# Altium PCB Piezo_Regulator_Head.PcbDoc (part 3 of 4)
Units mil, origin at the board's own origin, x right, y up, seen from the top; angles counter-clockwise.
Board outline 2047.24 x 1850.39 mil, 6 copper layers (Top Layer, GROUND, SIGNAL1, SIGNAL2, POWER, Bottom Layer), stack 60.866 mil thick; 136 components, 91 nets, 517 pads, 213 vias.
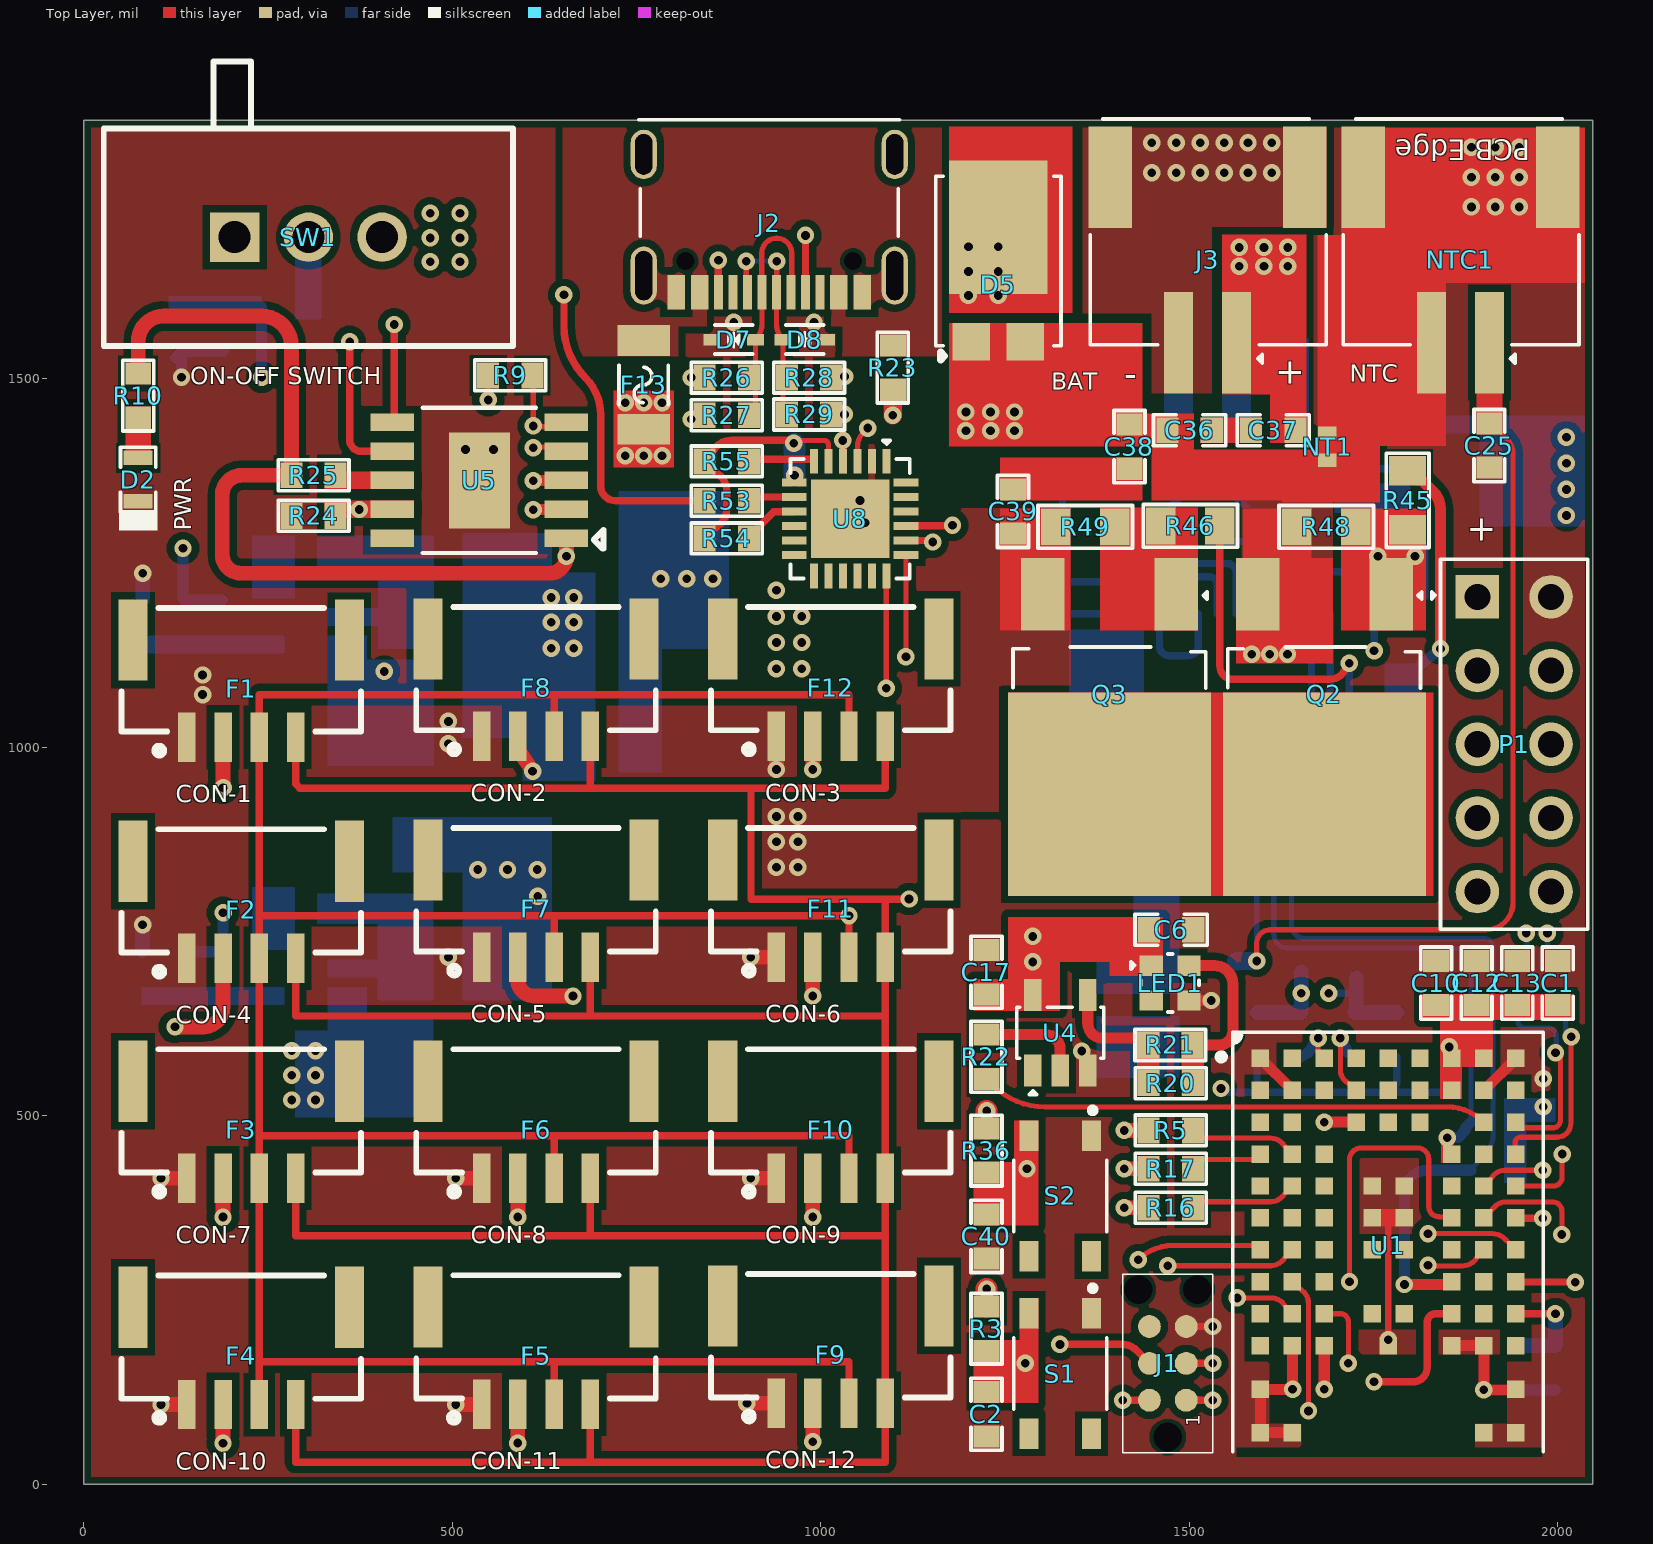
[diagram p0: Top Layer view]

## Part data (continued)
S1 S2: "SWITCH TACTILE SPST-NO 0.05A 16V", Case/Package=SMD/SMT, Color=Clear, Contact Current Rating=50mA, Contact Resistance=500mΩ, Insulation Resistance=100MΩ, Manufacturer=ALPS, Max Operating Temperature=85°C, Max Voltage Rating (DC)=16V, Min Operating Temperature=-30°C, Operating Force=1.57N, Supplier Part Number=4809-SKRPABE010CT-ND, Actuator Length=711.2µm, ComponentLink1Description=https://datasheet.octopart.com:443/SKRPABE010-ALPS-datasheet-182234810.pdf?src-supplier=IHS, ComponentLink1URL=https://datasheet.octopart.com:443/SKRPABE010-ALPS-datasheet-182234810.pdf?src-supplier=IHS, ComponentLink2Description=https://datasheet.octopart.com:443/SKRPABE010-ALPS-datasheet-182235266.pdf?src-supplier=IHS, ComponentLink2URL=https://datasheet.octopart.com:443/SKRPABE010-ALPS-datasheet-182235266.pdf?src-supplier=IHS, ComponentLink3Description=https://datasheet.octopart.com:443/SKRPABE010-ALPS-datasheet-41327040.pdf?src-supplier=Master+Electronics, ComponentLink3URL=https://datasheet.octopart.com:443/SKRPABE010-ALPS-datasheet-41327040.pdf?src-supplier=Master+Electronics, ComponentLink4Description=https://datasheet.octopart.com:443/SKRPABE010-ALPS-datasheet-138899521.pdf?src-supplier=TME, ComponentLink4URL=https://datasheet.octopart.com:443/SKRPABE010-ALPS-datasheet-138899521.pdf?src-supplier=TME, ComponentLink5Description=https://datasheet.octopart.com:443/SKRPABE010-ALPS-datasheet-37145204.pdf?src-supplier=Electro+Sonic, ComponentLink5URL=https://datasheet.octopart.com:443/SKRPABE010-ALPS-datasheet-37145204.pdf?src-supplier=Electro+Sonic, Contact Plating=Silver, Current Rating=50mA, Depth=4.6mm, Electrical Life=100kcycles, Height=1.8034mm, Item Type="Tactile Switches", Lead Free="Lead Free", Length=4.191mm, Life (Cycles)=100kcycles, Lifecycle Status=Production, Manufacturer Part Number=SKRPABE010, Max Current Rating=50mA, Mounting Technology="Surface Mount", Number of Positions=1, Orientation=Straight, Pricing="1=0.21, 10=0.179, 25=0.1684, 100=0.1511, 250=0.14016, 500=0.13228, 1000=0.12484 (USD)", Radiation Hardening=No, RoHS=Compliant, Stock=35807, Supplier=DigiKey, Termination=J-Bend, Throw Configuration=SPST, Voltage Rating (DC)=16V
SW1: "SWITCH SLIDE SPDT 4A 125V", Contact Current Rating=2A, Contact Resistance=10mΩ, Contact Voltage Rating (AC)=250V, Current Rating=1A, Dielectric Material=Thermoplastic, Insulation Resistance=1GΩ, Manufacturer=APEM, Max Operating Temperature=85°C, Max Voltage Rating (DC)=30V, Min Operating Temperature=-40°C, Voltage Rating (AC)=125V, Actuator Length=2.3mm, Actuator Material="Glass, Glass fibre, Nylon, Polyamide", ComponentLink1Description=https://datasheet.octopart.com:443/25336NA-APEM-datasheet-13521368.pdf?src-supplier=IHS, ComponentLink1URL=https://datasheet.octopart.com:443/25336NA-APEM-datasheet-13521368.pdf?src-supplier=IHS, ComponentLink2Description=https://datasheet.octopart.com:443/25336NA-APEM-datasheet-41567066.pdf?src-supplier=Master+Electronics, ComponentLink2URL=https://datasheet.octopart.com:443/25336NA-APEM-datasheet-41567066.pdf?src-supplier=Master+Electronics, ComponentLink3Description=https://datasheet.octopart.com:443/25336NA-APEM-datasheet-178036094.pdf?src-supplier=TME, ComponentLink3URL=https://datasheet.octopart.com:443/25336NA-APEM-datasheet-178036094.pdf?src-supplier=TME, ComponentLink4Description=https://datasheet.octopart.com:443/25336NA-APEM-datasheet-10337772.pdf?src-supplier=Newark, ComponentLink4URL=https://datasheet.octopart.com:443/25336NA-APEM-datasheet-10337772.pdf?src-supplier=Newark, ComponentLink5Description=https://datasheet.octopart.com:443/25336NA-APEM-datasheet-23707371.pdf?src-supplier=Electro+Sonic, ComponentLink5URL=https://datasheet.octopart.com:443/25336NA-APEM-datasheet-23707371.pdf?src-supplier=Electro+Sonic, ComponentLink6Description=https://datasheet.octopart.com:443/25336NA-APEM-datasheet-165057810.pdf?src-supplier=Burklin+Elektronik, ComponentLink6URL=https://datasheet.octopart.com:443/25336NA-APEM-datasheet-165057810.pdf?src-supplier=Burklin+Elektronik, ComponentLink7Description=https://datasheet.octopart.com:443/25336NA-APEM-datasheet-491718.pdf?src-supplier=Factory+Futures, ComponentLink7URL=https://datasheet.octopart.com:443/25336NA-APEM-datasheet-491718.pdf?src-supplier=Factory+Futures, Contact Material=Silver, Contact Plating=Silver, Depth=9.8mm, Electrical Life=10kcycles, Height=8.1mm, Item Type="Slide Switches", Length=14.1mm, Life (Cycles)=10kcycles, Lifecycle Status=Production, Manufacturer Part Number=25336NA, Max Current Rating=1A, Max Voltage Rating (AC)=250V, Mechanical Life=20kcycles, Mounting Technology="Through Hole", Number of Positions=2, Orientation="Right Angle", Packaging=Bulk, Pricing="1=2.2457 (USD)", REACH SVHC=Yes, RoHS=Compliant, Sealable="EPOXY TERMINAL SEALED", Stock=4, Supplier="Arrow Electronics", Supplier Part Number=25336NA, Switch Function=On-On, Switch Travel=4mm, Terminal Material=Silver, Termination="PC Pin", Throw Configuration=SPDT, Voltage Rating (DC)=30V, Width=14mm
TVS1: "TVS DIODE 24VWM 44VC SOT233", Breakdown Voltage=29.1V, Case/Package=SOT-23, Clamping Voltage=44V, LCSC Part Number=C14486, Leakage Current=100nA, Manufacturer=onsemi, Manufacturer Lifecycle Status=ACTIVE, Max Breakdown Voltage=32V, Max Operating Temperature=150°C, Max Power Dissipation=350W, Max Surge Current=8A, Min Breakdown Voltage=26.2V, Min Operating Temperature=-55°C, Operating Supply Voltage=24V, Power Line Protection=No, Test Current=1mA, China RoHS=Compliant, ComponentLink1Description=https://datasheet.octopart.com:443/NUP2105LT1G-onsemi-datasheet-180968600.pdf?src-supplier=IHS, ComponentLink1URL=https://datasheet.octopart.com:443/NUP2105LT1G-onsemi-datasheet-180968600.pdf?src-supplier=IHS, ComponentLink2Description=https://datasheet.octopart.com:443/NUP2105LT1G-ON-Semiconductor-datasheet-141916699.pdf?src-supplier=Upverter, ComponentLink2URL=https://datasheet.octopart.com:443/NUP2105LT1G-ON-Semiconductor-datasheet-141916699.pdf?src-supplier=Upverter, ComponentLink3Description=https://datasheet.octopart.com:443/NUP2105LT1G-ON-Semiconductor-datasheet-138898254.pdf?src-supplier=onsemi, ComponentLink3URL=https://datasheet.octopart.com:443/NUP2105LT1G-ON-Semiconductor-datasheet-138898254.pdf?src-supplier=onsemi, ComponentLink4Description=https://datasheet.octopart.com:443/NUP2105LT1G-ON-Semiconductor-datasheet-8329749.pdf?src-supplier=element14+APAC, ComponentLink4URL=https://datasheet.octopart.com:443/NUP2105LT1G-ON-Semiconductor-datasheet-8329749.pdf?src-supplier=element14+APAC, ComponentLink5Description=https://datasheet.octopart.com:443/NUP2105LT1G-onsemi-datasheet-163746571.pdf?src-supplier=element14+APAC, ComponentLink5URL=https://datasheet.octopart.com:443/NUP2105LT1G-onsemi-datasheet-163746571.pdf?src-supplier=element14+APAC, ComponentLink6Description=https://datasheet.octopart.com:443/NUP2105LT1G-ON-Semiconductor-datasheet-62289975.pdf?src-supplier=RS+(Formerly+Allied+Electronics), ComponentLink6URL=https://datasheet.octopart.com:443/NUP2105LT1G-ON-Semiconductor-datasheet-62289975.pdf?src-supplier=RS+(Formerly+Allied+Electronics), ComponentLink7Description=https://datasheet.octopart.com:443/NUP2105LT1G-ON-Semiconductor-datasheet-10979798.pdf?src-supplier=TME, ComponentLink7URL=https://datasheet.octopart.com:443/NUP2105LT1G-ON-Semiconductor-datasheet-10979798.pdf?src-supplier=TME, ComponentLink8Description=https://datasheet.octopart.com:443/NUP2105LT1G-onsemi-datasheet-157205202.pdf?src-supplier=TME, ComponentLink8URL=https://datasheet.octopart.com:443/NUP2105LT1G-onsemi-datasheet-157205202.pdf?src-supplier=TME, ComponentLink9Description=https://datasheet.octopart.com:443/NUP2105LT1G-onsemi-datasheet-38906.pdf?src-supplier=Master+Electronics, ComponentLink9URL=https://datasheet.octopart.com:443/NUP2105LT1G-onsemi-datasheet-38906.pdf?src-supplier=Master+Electronics, ComponentLink10Description=https://datasheet.octopart.com:443/NUP2105LT1G.-ON-Semiconductor-datasheet-94100686.pdf?src-supplier=Newark, ComponentLink10URL=https://datasheet.octopart.com:443/NUP2105LT1G.-ON-Semiconductor-datasheet-94100686.pdf?src-supplier=Newark, ComponentLink11Description=https://datasheet.octopart.com:443/NUP2105LT1G-ON-Semiconductor-datasheet-14047665.pdf?src-supplier=iiiC, ComponentLink11URL=https://datasheet.octopart.com:443/NUP2105LT1G-ON-Semiconductor-datasheet-14047665.pdf?src-supplier=iiiC, ComponentLink12Description=http://sigma.octopart.com:80/15540786/rohs_certificate/ON-Semiconductor-NUP2105LT1G.pdf?src-supplier=Compliance+Statements, ComponentLink12URL=http://sigma.octopart.com:80/15540786/rohs_certificate/ON-Semiconductor-NUP2105LT1G.pdf?src-supplier=Compliance+Statements, ComponentLink13Description=http://sigma.octopart.com:80/15684253/materials_sheet/ON-Semiconductor-NUP2105LT1G.csv?src-supplier=Compliance+Statements, ComponentLink13URL=http://sigma.octopart.com:80/15684253/materials_sheet/ON-Semiconductor-NUP2105LT1G.csv?src-supplier=Compliance+Statements, ComponentLink14Description=http://sigma.octopart.com:80/150629775/rohs_statement/ON-Semiconductor-NUP2105LT1G.pdf?src-supplier=Compliance+Statements, ComponentLink14URL=http://sigma.octopart.com:80/150629775/rohs_statement/ON-Semiconductor-NUP2105LT1G.pdf?src-supplier=Compliance+Statements, ComponentLink15Description=http://sigma.octopart.com:80/reach_statement/ON-Semiconductor-company-79.pdf?src-supplier=Compliance+Statements, ComponentLink15URL=http://sigma.octopart.com:80/reach_statement/ON-Semiconductor-company-79.pdf?src-supplier=Compliance+Statements, ComponentLink16Description=https://octopart.com:443/opatz8j6/c1?t=ZMQXRxl-tlOkTyCYWhiMSP0LPI36EMzxCu-rt4xVRkID6w1lkEqxXgfbyVHAv14EjzJQpMVrLm_GTNZmohIwKCbSQuhxgS4aaCOzuMZuzdtTNQjpOCOkObyoWTwnGitjD_aKANRAh2lPw-KtIiSN1C9a6qccJDCVrU3OyukjJjMVpNxQPGMvXs50OIMOtkcrM5shLr84_QV0TpV-tx49makq4PEa-F8ImDZxhjRMek526FA-FcjWLTSpNIusNfqu_3SnxPi4ucx5Ny24zrervKXbTtAk3aU33KfwhMqxTE9mwBLbd5ol23c2I0SDhKArEjQYMqXQ2s8XiDN6A3kYu5cM-5e4RY3v1HohIOej&src-supplier=Compliance+Statements, ComponentLink16URL=https://octopart.com:443/opatz8j6/c1?t=ZMQXRxl-tlOkTyCYWhiMSP0LPI36EMzxCu-rt4xVRkID6w1lkEqxXgfbyVHAv14EjzJQpMVrLm_GTNZmohIwKCbSQuhxgS4aaCOzuMZuzdtTNQjpOCOkObyoWTwnGitjD_aKANRAh2lPw-KtIiSN1C9a6qccJDCVrU3OyukjJjMVpNxQPGMvXs50OIMOtkcrM5shLr84_QV0TpV-tx49makq4PEa-F8ImDZxhjRMek526FA-FcjWLTSpNIusNfqu_3SnxPi4ucx5Ny24zrervKXbTtAk3aU33KfwhMqxTE9mwBLbd5ol23c2I0SDhKArEjQYMqXQ2s8XiDN6A3kYu5cM-5e4RY3v1HohIOej&src-supplier=Compliance+Statements, ComponentLink17Description=https://octopart.com:443/opatz8j6/c1?t=YAOrV0sMfXqVKWiE8k6dH1WclSlXB8gtlFWIwd4S7cYIeFCwgkBwbQJ5bWgsFHDi1PC-Qpb_Ct26CUG4UP-SQd806vdedNOA1AZ0mSUejaT1W15FwcKfZSqKtOg6OcLIZhGfUMXc4tA2cbQkgpIhx2KL7fZwcWhjVKDmOvUiltx43fdyMtIeSqzWtG30gLqCacBQFQmUjDNp97EetbhDXMa2NNxkO77MiJ1iJWdcIgpl2SLRAqm79JYpxIDHGLW2aimYKGEaixugE9-YzaQRB_J1_LvMpaZzYYa86eJBg1j47JCsO_PKNIbsx3s0tfo-1v4YqdsprCQBLNtzKj_wzUXjJuCrJvlRKr5GCqo&src-supplier=Compliance+Statements, ComponentLink17URL=https://octopart.com:443/opatz8j6/c1?t=YAOrV0sMfXqVKWiE8k6dH1WclSlXB8gtlFWIwd4S7cYIeFCwgkBwbQJ5bWgsFHDi1PC-Qpb_Ct26CUG4UP-SQd806vdedNOA1AZ0mSUejaT1W15FwcKfZSqKtOg6OcLIZhGfUMXc4tA2cbQkgpIhx2KL7fZwcWhjVKDmOvUiltx43fdyMtIeSqzWtG30gLqCacBQFQmUjDNp97EetbhDXMa2NNxkO77MiJ1iJWdcIgpl2SLRAqm79JYpxIDHGLW2aimYKGEaixugE9-YzaQRB_J1_LvMpaZzYYa86eJBg1j47JCsO_PKNIbsx3s0tfo-1v4YqdsprCQBLNtzKj_wzUXjJuCrJvlRKr5GCqo&src-supplier=Compliance+Statements, Composition=Zener, Contact Plating=Tin, Depth=1.3mm, Direction=Bidirectional, Element Configuration=Dual, ESD Protection=Yes, Halogen Free="Halogen Free", Height=940µm, Item Type="TVS Diodes", Lead Free="Lead Free", Length=2.9mm, Lifecycle Status=Production, Manufacturer Part Number=NUP2105LT1G, Max Reverse Leakage Current=100nA, Number of Bidirectional Channels=2, Number of Channels=2, Number of Elements=2, Number of Lines=2, Number of Terminals=3, Packaging="Tape and Reel", Peak Pulse Current=8A, Peak Pulse Power=350W, Peak Reverse Current=100nA, Pins=3, Polarity=Bidirectional, Pricing="3000=0.0671 (USD)", Radiation Hardening=No, REACH SVHC=Yes, Reverse Standoff Voltage=24V, RoHS=Compliant, Stock=2046000, Supplier="Arrow Electronics", Termination=SMD/SMT, Width=1.3mm, Working Voltage=24V
U1: "RF TXRX MOD BT /ANTU.FL SMD", Manufacturer=u-blox, Max Operating Temperature=105°C, Max Supply Voltage=3.6V, Min Operating Temperature=-40°C, Min Supply Voltage=1.7V, Operating Supply Voltage=3.3V, ComponentLink1Description=https://datasheet.octopart.com:443/NORA-B120-00B-u-blox-datasheet-175595538.pdf?src-supplier=IHS, ComponentLink1URL=https://datasheet.octopart.com:443/NORA-B120-00B-u-blox-datasheet-175595538.pdf?src-supplier=IHS, ComponentLink2Description=https://datasheet.octopart.com:443/NORA-B120-00B-u-blox-datasheet-166811452.pdf?src-supplier=TME, ComponentLink2URL=https://datasheet.octopart.com:443/NORA-B120-00B-u-blox-datasheet-166811452.pdf?src-supplier=TME, ComponentLink3Description=https://datasheet.octopart.com:443/NORA-B120-00B-u-blox-datasheet-166532002.pdf?src-supplier=TME, ComponentLink3URL=https://datasheet.octopart.com:443/NORA-B120-00B-u-blox-datasheet-166532002.pdf?src-supplier=TME, Height - Seated (Max)=1.9mm, Item Type=Module, Length=14.3mm, Lifecycle Status=Production, Manufacturer Part Number=NORA-B120-00B, Number of Terminals=82, Pricing="500=11.22667, 1000=11.00654, 2000=10.85052, 4000=10.69886, 8000=10.525 (USD)", RoHS=Compliant, Stock=500, Supplier=Avnet, Supplier Part Number=NORA-B120-00B, Terminal Pitch=1.1mm, Width=10.4mm
U2 U3: "IC REG BUCK ADJ 2A SOT23", Case/Package=SOT-23-6, Manufacturer="Texas Instruments", Manufacturer Lifecycle Status=ACTIVE, Max Junction Temperature (Tj)=125°C, Max Output Voltage=28V, Min Input Voltage=4.5V, Min Operating Temperature=-40°C, Min Output Voltage=596mV, Nominal Supply Current=45µA, Output Current=2A, Quiescent Current=40µA, Supplier Part Number=296-TPS54202DDCRCT-ND, Switching Frequency=500kHz, ComponentLink1Description=https://sigma.octopart.com:443/180581133/technical_drawing/Texas-Instruments-TPS54202DDCR.pdf?src-supplier=Texas+Instruments, ComponentLink1URL=https://sigma.octopart.com:443/180581133/technical_drawing/Texas-Instruments-TPS54202DDCR.pdf?src-supplier=Texas+Instruments, ComponentLink2Description=https://octopart.com:443/opatz8j6/c1?t=FAFTCw9MUHEpg05pud1ULAyccV128Rvs4kpgtbIHJK4QnZYUn5DIlTqILZCRn3OGKuIK2OAwsfJUaHqp_uWt2XWRUIWZjvnlSsBH8aSBLHpCm5pUgjYkmYK7aQZ1tKHDT4GDuf94S2TW-N1iaYVMc29JfnO6Y5xBGsqSuWmXlwMR5Pf7MLFg3XCbpaNjJfeHg6VBfvWZIp62-z7iIfeN-xLXbqauIUvBeZHqQTWCwBkKVxqgCgQQwDnJZoJ9yjTomjI04wnmJO18egisqEyqoosAlQPDDAhdHAxkSRGJnBHeBom8jBmTnp4C8Wpyey22POweYbBp_aNhdPUtTJQM6gKaI5oNKWbufVAnfV7bde1UKHIaUN1cgnNmWHvEiIDYXKFykrh0&src-supplier=Texas+Instruments, ComponentLink2URL=https://octopart.com:443/opatz8j6/c1?t=FAFTCw9MUHEpg05pud1ULAyccV128Rvs4kpgtbIHJK4QnZYUn5DIlTqILZCRn3OGKuIK2OAwsfJUaHqp_uWt2XWRUIWZjvnlSsBH8aSBLHpCm5pUgjYkmYK7aQZ1tKHDT4GDuf94S2TW-N1iaYVMc29JfnO6Y5xBGsqSuWmXlwMR5Pf7MLFg3XCbpaNjJfeHg6VBfvWZIp62-z7iIfeN-xLXbqauIUvBeZHqQTWCwBkKVxqgCgQQwDnJZoJ9yjTomjI04wnmJO18egisqEyqoosAlQPDDAhdHAxkSRGJnBHeBom8jBmTnp4C8Wpyey22POweYbBp_aNhdPUtTJQM6gKaI5oNKWbufVAnfV7bde1UKHIaUN1cgnNmWHvEiIDYXKFykrh0&src-supplier=Texas+Instruments, ComponentLink3Description=https://sigma.octopart.com:443/179311906/technical_drawing/Texas-Instruments-TPS54202DDCR.pdf?src-supplier=Texas+Instruments, ComponentLink3URL=https://sigma.octopart.com:443/179311906/technical_drawing/Texas-Instruments-TPS54202DDCR.pdf?src-supplier=Texas+Instruments, ComponentLink4Description=https://sigma.octopart.com:443/159779760/technical_drawing/Texas-Instruments-TPS54202DDCR.pdf?src-supplier=Texas+Instruments, ComponentLink4URL=https://sigma.octopart.com:443/159779760/technical_drawing/Texas-Instruments-TPS54202DDCR.pdf?src-supplier=Texas+Instruments, ComponentLink5Description=https://sigma.octopart.com:443/149167535/technical_drawing/Texas-Instruments-TPS54202DDCR.pdf?src-supplier=Texas+Instruments, ComponentLink5URL=https://sigma.octopart.com:443/149167535/technical_drawing/Texas-Instruments-TPS54202DDCR.pdf?src-supplier=Texas+Instruments, ComponentLink6Description=https://sigma.octopart.com:443/49250152/technical_drawing/Texas-Instruments-TPS54202DDCR.pdf?src-supplier=Texas+Instruments, ComponentLink6URL=https://sigma.octopart.com:443/49250152/technical_drawing/Texas-Instruments-TPS54202DDCR.pdf?src-supplier=Texas+Instruments, ComponentLink7Description=https://datasheet.octopart.com:443/TPS54202DDCR-Texas-Instruments-datasheet-100480396.pdf?src-supplier=Upverter, ComponentLink7URL=https://datasheet.octopart.com:443/TPS54202DDCR-Texas-Instruments-datasheet-100480396.pdf?src-supplier=Upverter, ComponentLink8Description=https://datasheet.octopart.com:443/TPS54202DDCR-Texas-Instruments-datasheet-165804749.pdf?src-supplier=LCSC, ComponentLink8URL=https://datasheet.octopart.com:443/TPS54202DDCR-Texas-Instruments-datasheet-165804749.pdf?src-supplier=LCSC, ComponentLink9Description=https://datasheet.octopart.com:443/TPS54202DDCR-Texas-Instruments-datasheet-159118069.pdf?src-supplier=LCSC, ComponentLink9URL=https://datasheet.octopart.com:443/TPS54202DDCR-Texas-Instruments-datasheet-159118069.pdf?src-supplier=LCSC, ComponentLink10Description=https://datasheet.octopart.com:443/TPS54202DDCR-Texas-Instruments-datasheet-142296497.pdf?src-supplier=Arrow.cn, ComponentLink10URL=https://datasheet.octopart.com:443/TPS54202DDCR-Texas-Instruments-datasheet-142296497.pdf?src-supplier=Arrow.cn, ComponentLink11Description=http://sigma.octopart.com:80/conflict_mineral_statement/Texas-Instruments-company-63.pdf?src-supplier=Compliance+Statements, ComponentLink11URL=http://sigma.octopart.com:80/conflict_mineral_statement/Texas-Instruments-company-63.pdf?src-supplier=Compliance+Statements, ComponentLink12Description=http://sigma.octopart.com:80/reach_statement/Texas-Instruments-company-64.pdf?src-supplier=Compliance+Statements, ComponentLink12URL=http://sigma.octopart.com:80/reach_statement/Texas-Instruments-company-64.pdf?src-supplier=Compliance+Statements, Height=1.1mm, Item Type=IC, Lead Free="Lead Free", Length=2.9mm, Lifecycle Status=Production, Manufacturer Part Number=TPS54202DDCR, Max Duty Cycle=100%, Max Operating Temperature=125°C, Max Supply Voltage=28V, Min Supply Voltage=4.5V, Mounting Technology="Surface Mount", Number of Channels=1, Number of Outputs=1, Output Configuration=Positive, Output Type=Adjustable, Pins=6, Pricing="1=1.17, 10=0.844, 25=0.7636, 100=0.6746, 250=0.63224, 500=0.60672, 1000=0.5857 (USD)", RoHS=Compliant, Schedule B="8542390000, 8542390000|8542390000|8542390000|8542390000|8542390000", Stock=4194, Supplier=DigiKey, Synchronous Rectifier=Yes, Thickness=870µm, Topology=Buck, Width=1.6mm
U4: "IC BUF NON-INVERT 5.5V SOT23-5", Case/Package=SOT-23-5, High Level Output Current=-8mA, LCSC Part Number=C100024, Low Level Output Current=8mA, Manufacturer="Texas Instruments", Max Operating Temperature=125°C, Max Supply Voltage=5.5V, Min Operating Temperature=-40°C, Min Supply Voltage=1.6V, Package Quantity=3000, Quiescent Current=1uA, Supplier Part Number 1=296-37176-6-ND, ComponentLink1Description=http://www.ti.com/lit/pdf/sdyu001?src-supplier=Digi-Key, ComponentLink1URL=http://www.ti.com/lit/pdf/sdyu001?src-supplier=Digi-Key, ComponentLink2Description=http://www.ti.com/lit/ds/symlink/sn74lv1t34.pdf?src-supplier=Avnet, ComponentLink2URL=http://www.ti.com/lit/ds/symlink/sn74lv1t34.pdf?src-supplier=Avnet, Item Type=IC, Lead Free="Lead Free", Logic Function=Buffer,Inverting, Manufacturer Part Number=SN74LV1T34DBVR, Mount="Surface Mount", Number of Bits=1, Number of Bits per Element=1, Number of Channels=1, Number of Elements=1, Number of Input Lines=1, Number of Inputs=1, Number of Output Lines=1, Number of Outputs=1, Number of Pins=5, Operating Supply Current=8mA, Packaging="Tape and Reel", Polarity=Non-Inverting, Pricing 1="1=0.43, 10=0.349, 25=0.3192, 100=0.2374, 250=0.2152, 500=0.17808, 1000=0.13356 (USD)", Propagation Delay=15.5ns, Radiation Hardening=No, REACH SVHC="No SVHC", RoHS Compliant=Yes, Stock 1=37360, Supplier 1=Digi-Key, Weight=0.000353oz
U5: "ESSOP-10-150mil-1mm USB PD ROHS", LCSC Part Number=C970725, Manufacturer=WCH, Package=ESSOP-10-150mil-1mm, ComponentLink1Description=LCSC, ComponentLink1URL=https://www.lcsc.com/product-detail/USB-PD_WCH-Jiangsu-Qin-Heng-CH224K_C970725.html, Item Type=IC, Manufacturer Part Number=CH224K
U6: "SOT-223 Linear Voltage Regulators (LDO) ROHS", LCSC Part Number=C5181462, Manufacturer=HX(hengjiaxing), Package=SOT-223, ComponentLink1Description=LCSC, ComponentLink1URL=https://www.lcsc.com/product-detail/Linear-Voltage-Regulators-LDO_HX-hengjiaxing-AMS1117-5-0_C5181462.html, Item Type=IC, Manufacturer Part Number=AMS1117-5.0
U7: "IC BATT MON MULTI 3-5C 20TSSOP", Manufacturer="Texas Instruments", Supplier Part Number=595-BQ7692006PWR, Category="Battery Management", ComponentLink1Description=https://datasheet.ciiva.com/48478/bq76920-48478374.pdf?src-supplier=Avnet, ComponentLink1URL=https://datasheet.ciiva.com/48478/bq76920-48478374.pdf?src-supplier=Avnet, Manufacturer Part Number=BQ7692006PWR, Pricing="1=3.26, 10=2.77, 50=2.77, 100=2.41, 1000=1.73, 10000=1.53 (USD)", RoHS=Yes, Stock=12739, Supplier=Mouser
U8: "IC USB TO UART BRIDGE QFN24", LCSC Part Number=C969151, Manufacturer="Silicon Labs", Supplier Part Number 1=336-5888-1-ND, Item Type=IC, Manufacturer Part Number=CP2102N-A02-GQFN24R, Pricing 1="1=1.56000 (USD)", RoHS=Yes, Supplier 1=Digi-Key

## Via types
v1: diameter 23.62, hole 11.81, Top Layer to Bottom Layer, tented both sides, 213 vias

## Nets (pads, with @x,y where several pads share a name; then routed paths per layer and width w, separated by ;. In a path a pad name is that pad's centre, name@x,y a point inside that pad or via, vN(x,y) a via of type N, cw(c..) or ccw(c..) an arc to the next point about the centre after c; other vN are vias at no path point)
3V3: C1.2 C7.2 C10.2 C12.2 C13.2 C14.2 J1.1 L1.2 P1.9 R1.2 R2.2 R3.2 R4.2 R31.2 R32.2 R36.2 R54.1 R55.1 U1.A7 U1.A8 U1.B7 U8.5 U8.7 | length 2542.5
  Top Layer w4: U8.7@964.21,1359.21 964.21,1369.26 964.6,1369.26 v1(964.61,1368.84)
  Top Layer w7: v1@963.72,1416.23 1004.67,1416.23 cw(c1004.67,1410.42) 1010.47,1410.42 U8.5@1010.47,1387.76
  Top Layer w10: R54.1@842.56,1283.26 852.56,1295.38 ccw(c842.56,1323.66) 872.56,1323.66 872.56,1347.24 ccw(c842.56,1347.24) 852.56,1375.53 R55.1@842.56,1387.76 850.48,1387.76 852.56,1400.26 856.47,1405.33 cw(c879.25,1387.76) 879.25,1416.52 959.64,1416.52 cw(c959.64,1412.46) v1(963.7,1412.46) ; J1.1@1496,114 v1(1532.02,114) ; U1.A7@1856.54,577.87 U1.A8@1899.84,577.87
  Top Layer w30: R3.2@1225,241.02 v1@1225,264.8 ; R36.2@1225,482.76 v1@1225,506.53
  POWER w10: v1(189.21,775.38) 211.71,797.88 v1(616.16,797.88)
  SIGNAL1 w25: v1(616.16,797.88) 973.68,797.88 ccw(c973.68,862.62) 1038.43,862.62 1038.43,1237.93 1038.43,1238 ccw(c900.76,1238) 998.1,1335.35 v1(964.61,1368.84)
  Bottom Layer w10: v1(963.7,1412.46) cw(c963.7,1411.55) v1@964.61,1411.55 ; v1@1543.13,531.94 1543.22,531.86 1767.21,531.86 ; R2.2@1592,580 1592,548.36 ccw(c1608.5,548.36) 1608.5,531.86 ; R1.2@1782,580 1781.73,580 1781.73,546.38 cw(c1767.21,546.38) 1767.21,531.86 ; 1858.49,546.38 cw(c1843.97,546.38) 1843.97,531.86 1767.21,531.86 ; R31.2@1942.37,491.26 1951.25,503.76 cw(c1971.62,485.49) 1963.34,511.57 v1@1980.55,517.08
  Bottom Layer w15: R4.2@134.66,722.48 C7.2@188.66,722.47 ; C7.2@189.21,723.03 188.93,723.31 188.93,775.1 v1(189.21,775.38)
  Bottom Layer w30: v1(964.61,1368.84) v1@964.61,1411.55
  other v1: 1225.23,264.8 1225.24,506.53 1980.55,512.08 1543.13,536.94 1852.74,593.31 534.65,833.96 575.06,833.96 615.47,833.96
5V: C6.2 C17.2 C21.2 LED1.1 U4.5 U6.2 U6.4
  other v1: 1287.6,708.63 1287.6,743.24 783.05,1228.37 818.46,1228.37 853.87,1228.37
12V: C8.2 C9.2 C20.2 F1.2 F2.2 F3.2 F4.2 F5.2 F6.2 F7.2 F8.2 F9.2 F10.2 F11.2 F12.2 L2.2 P1.10 R6.2 U6.3 | length 924.9
  Top Layer w20: v1(123.93,620.53) 162.56,620.53 ccw(c162.56,647.18) 180.92,627.87 ccw(c162.56,647.18) 181.87,628.82 ccw(c162.56,647.18) 189.21,647.18 F2.2@189.21,713.46 ; v1(189.12,55.56) 189.21,55.65 F4.2@189.21,108.11 F4.2@189.3,108.2 ; v1(189.12,362.45) 189.21,362.54 F3.2@189.21,415 F3.2@189.3,415.09 ; v1(189.21,945) F1.2@189.21,1013.46 ; v1(589.04,55.83) 589.12,55.91 589.12,108.38 F5.2@589.21,108.46 ; v1(589.12,362.45) 589.21,362.54 F6.2@589.21,415 F6.2@589.3,415.09 ; F7.2@589.12,714.91 589.12,684.16 ccw(c610.92,684.16) 610.92,662.37 v1(664.04,662.36) ; F8.2@589.21,1015 591.02,994.3 v1@609.19,967.83 ; v1(989.12,57.45) 989.21,57.54 F9.2@989.21,110 F9.2@989.3,110.09 ; v1(989.12,362.45) 989.21,362.54 F10.2@989.21,415 F10.2@989.3,415.09 ; v1(989.12,662.45) 989.21,662.54 F11.2@989.21,715 F11.2@989.3,715.09 ; v1(989.21,969.75) F12.2@989.21,1015
  Bottom Layer w15: R6.2@134.85,1199.48 C8.2@188.85,1199.47 ; R6.2@134.85,1199.48 v1(134.85,1269.88)
  other v1: 609.12,967.45 634.59,1134.18 665,1134.18 634.59,1169.59 665,1169.59 634.59,1203 665,1203
20V: C18.1 P1.1 R13.2 SW1.3 U3.3 | length 2216.9
  SIGNAL2 w25: v1(407.97,1102.78) 407.97,1495.98 cw(c453.43,1495.98) 453.43,1541.44 1837.99,1541.44 cw(c1837.99,1488.44) 1891,1488.44 P1.1@1891,1204
#BATT_P: C23.2 R33.2 U7.9 U7.10
#DSG: C39.1 Q3.3 R38.1 R40.2 R49.1
  other v1: 940,837 969.15,837 940,871.61 969.15,871.61 940,905.96 969.15,905.96
ALERT: C22.2 R30.2 U1.J9 U7.20 | length 1366
  Top Layer w10: U1.J9@1943.15,231.42 v1(1996.95,231.42)
  SIGNAL2 w10: v1(1750.87,1130.95) 1750.87,254.43 ccw(c1773.88,254.43) 1773.88,231.42 v1(1996.95,231.42)
  Bottom Layer w10: U7.20@1717.16,1181.24 1738.42,1181.24 cw(c1738.42,1168.31) 1751.35,1168.31 1751.35,1130.95 v1(1750.87,1130.95)
  Bottom Layer w20: C22.2@1943.15,188.11 R30.2@1996.95,188.11 v1(1996.95,231.42)
BAT.MEASURE: C11.2 R13.1 R14.2 U1.G2 | length 2678.1
  Top Layer w7: v1(1471,296.47) 1610.72,296.47 ccw(c1610.72,318.03) 1627.55,304.55 1631.69,309.72 U1.G2@1640,318.03
  SIGNAL1 w10: v1(241.54,1502) 241.54,386.44 ccw(c296.98,386.44) 296.98,331 1457,331 cw(c1457,317) 1471,317 v1(1471,296.47)
  Bottom Layer w15: v1(241.54,1502) R13.1@241.54,1597.51
BATT_N: D1.1 J3.2 J3.MP1 J3.MP2 NT2.1 R37.1 R40.1
  other v1: 940,1106.61 974.37,1106.61 940,1142.02 974.37,1142.02 940,1177.43 974.37,1177.43 940,1212.84 2011.88,1314.33 2011.88,1349.74 2011.88,1385.15 2011.88,1420.56 1449.18,1779.59 1482.59,1779.59 1515,1779.59 1547.41,1779.59 1579.82,1779.59 1612.23,1779.59 1449.18,1820 1482.59,1820 1515,1820 1547.41,1820 1579.82,1820 1612.23,1820
BATT_P: C5.1 C37.1 D1.2 D3.1 D5.3 D6.3 J3.1 J4.1 R34.2 R35.1 R53.1 SW1.2 U2.3 | length 513.7
  Top Layer w10: v1(651.7,1613.7) 651.7,1571.61 ccw(c750.88,1571.61) 680.75,1501.48 cw(c630.59,1451.32) 701.52,1451.32 701.52,1354.64 ccw(c721.73,1354.64) 721.73,1334.44 R53.1@842.56,1334.44
  Bottom Layer w10: C5.1@407.78,556.88 407.78,620
  Bottom Layer w30: C5.1@403.2,569.85 C5.1@428.85,569.85
  other v1: 282.35,521.37 314.56,521.37 282.35,554.78 314.56,554.78 282.35,588.19 314.56,588.19 1200.51,1612.99 1240.92,1612.99 1200.51,1645.4 1240.92,1645.4 1568.06,1652.66 1601.47,1652.66 1633.88,1652.66 470.32,1658.54 510.73,1658.54 1568.06,1678.08 1601.47,1678.08 1633.88,1678.08 1200.51,1678.81 1240.92,1678.81 470.32,1690.95 510.73,1690.95 470.32,1724.36 510.73,1724.36
C0: J4.6 NT2.2 R47.1
C1: J4.5 R43.1
C2: J4.4 R41.1
C3: J4.3 R39.1
CAP1: C26.2 U7.7 | length 85.4
  Bottom Layer w10: C26.2@1563.61,875.41 U7.7@1563.61,960.76
CC1: J2.A5 U5.7 | length 1081.1
  Top Layer w10: v1(361,1550) 361,1417.5 361,1417.42 ccw(c377.03,1417.4) 377.01,1401.37 394.36,1401.37 U5.7@418.89,1401.37 ; J2.A5@979.43,1617.38 v1(979.43,1694.39)
  SIGNAL1 w10: v1(361,1550) 993.29,1550 ccw(c993.29,1571.12) 1014.41,1571.12 1014.41,1652.51 ccw(c979.43,1652.51) 998.54,1681.81 v1(979.43,1694.39)
CC2: J2.B5 U5.6 | length 694.1
  Top Layer w10: U5.6@418.89,1440.74 421.47,1443.32 v1(421.47,1573.51) ; J2.B5@861.32,1617.38 v1(861.32,1660.56)
  SIGNAL1 w10: v1(421.47,1573.51) 838.42,1573.51 ccw(c838.42,1596.4) 861.32,1596.4 v1(861.32,1660.56)
CFG1: R5.1 R24.1 U5.9 | length 1947.7
  Top Layer w10: v1(373.82,1322.51) 373.82,1322.63 U5.9@418.89,1322.63
  Top Layer w20: v1(1412,480.07) R5.1@1445,480.07
  SIGNAL1 w10: v1(373.82,1322.51) 373.82,506.05 ccw(c399.8,506.05) 399.8,480.07 v1(1412,480.07)